# Altium PCB SolarPowerBank.PcbDoc
Units mm, origin at the board's own origin, x right, y up, seen from the top; angles counter-clockwise.
Board outline 50 x 50 mm, 2 copper layers (Top Layer, Bottom Layer); 81 components, 49 nets, 237 pads, 372 vias.
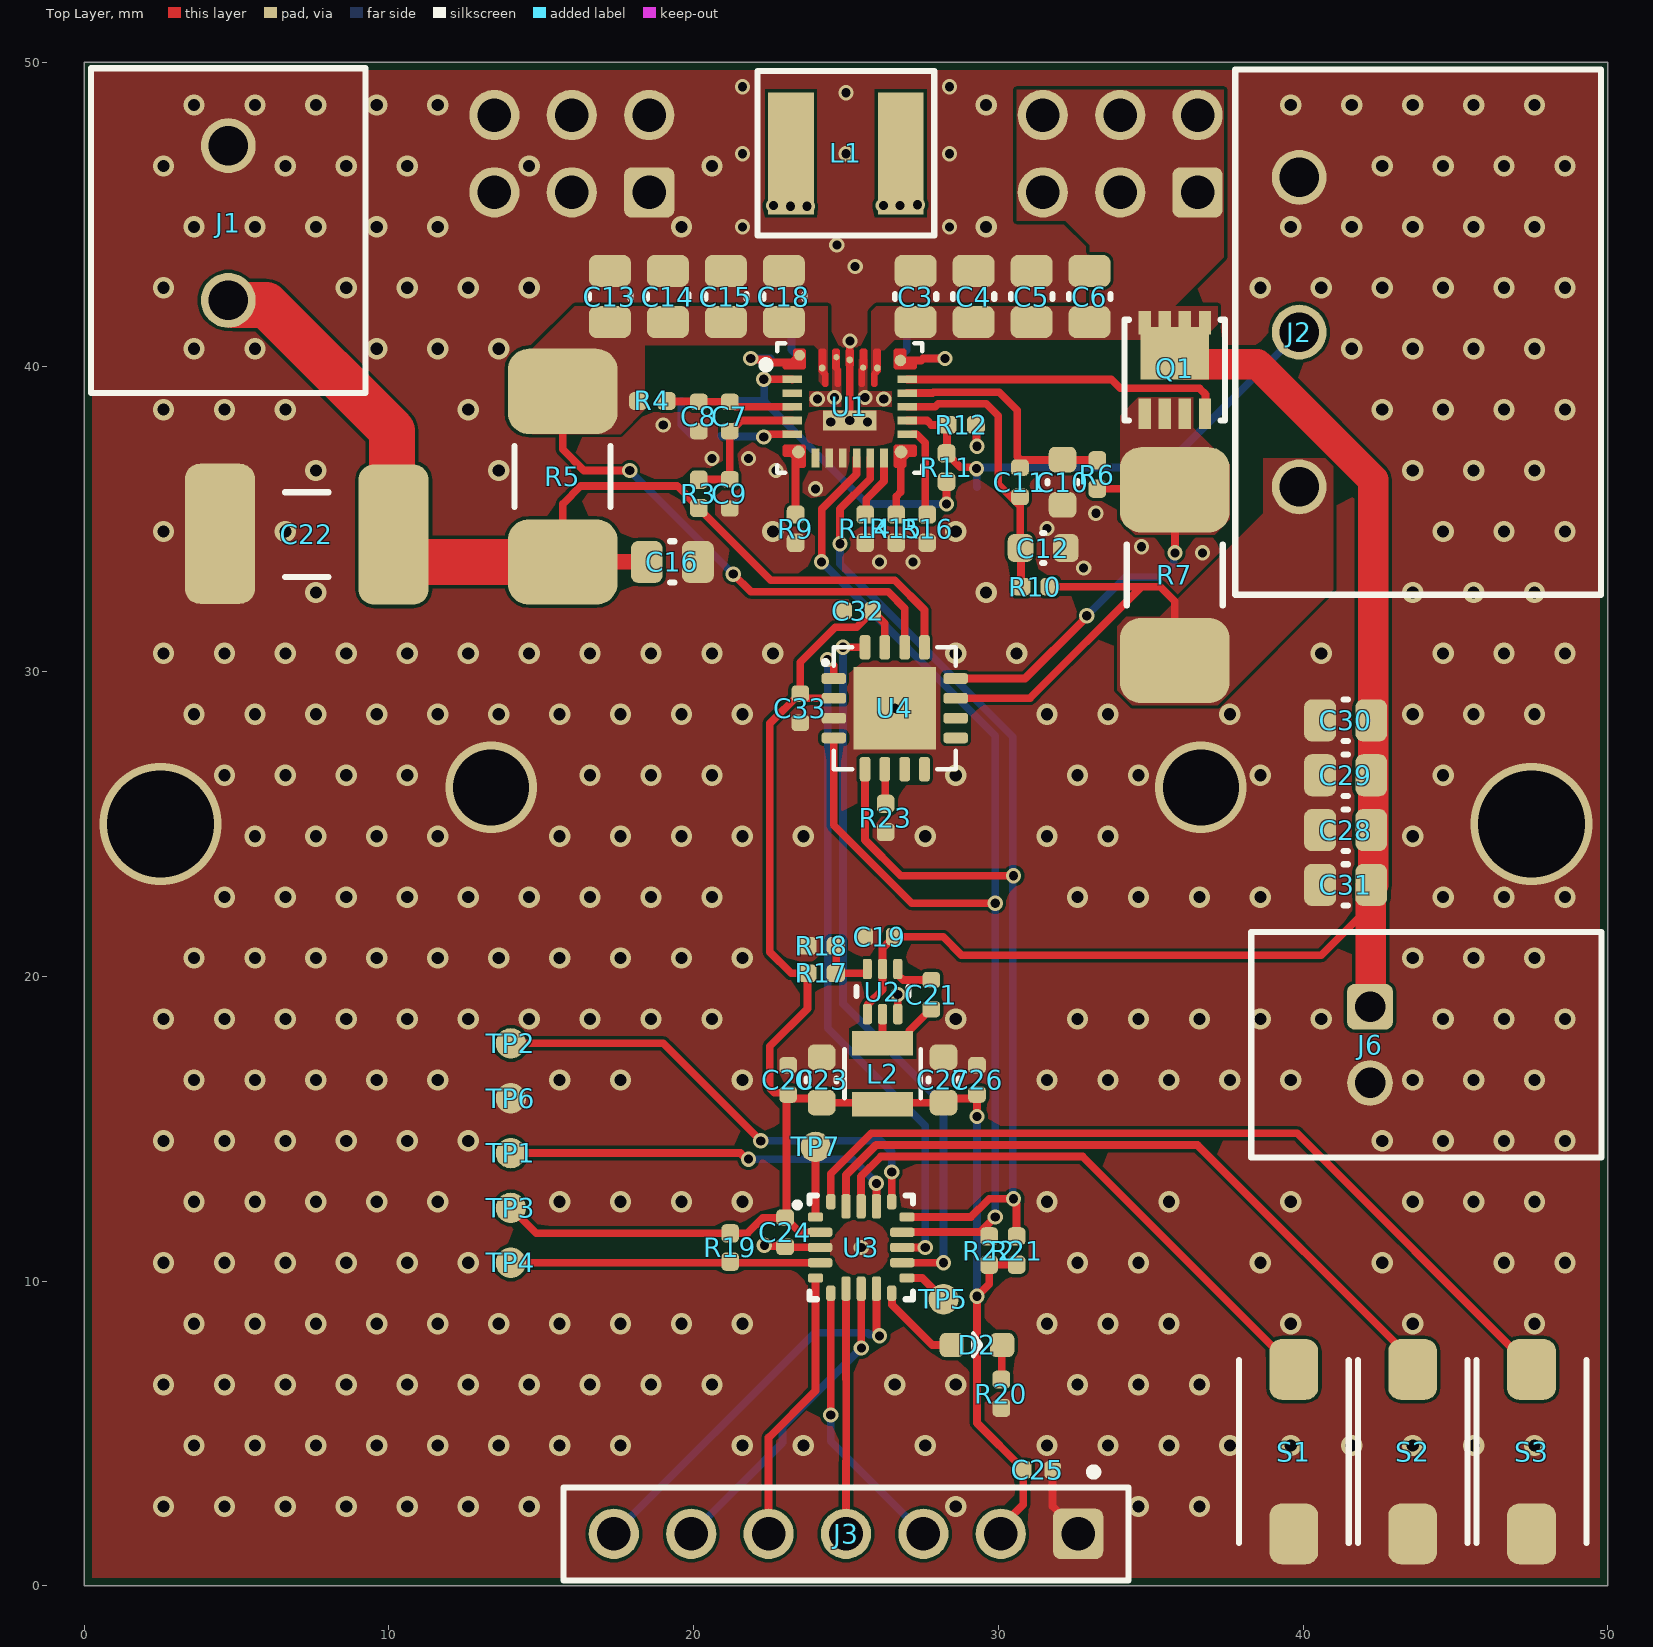
[diagram p0: Top Layer view]
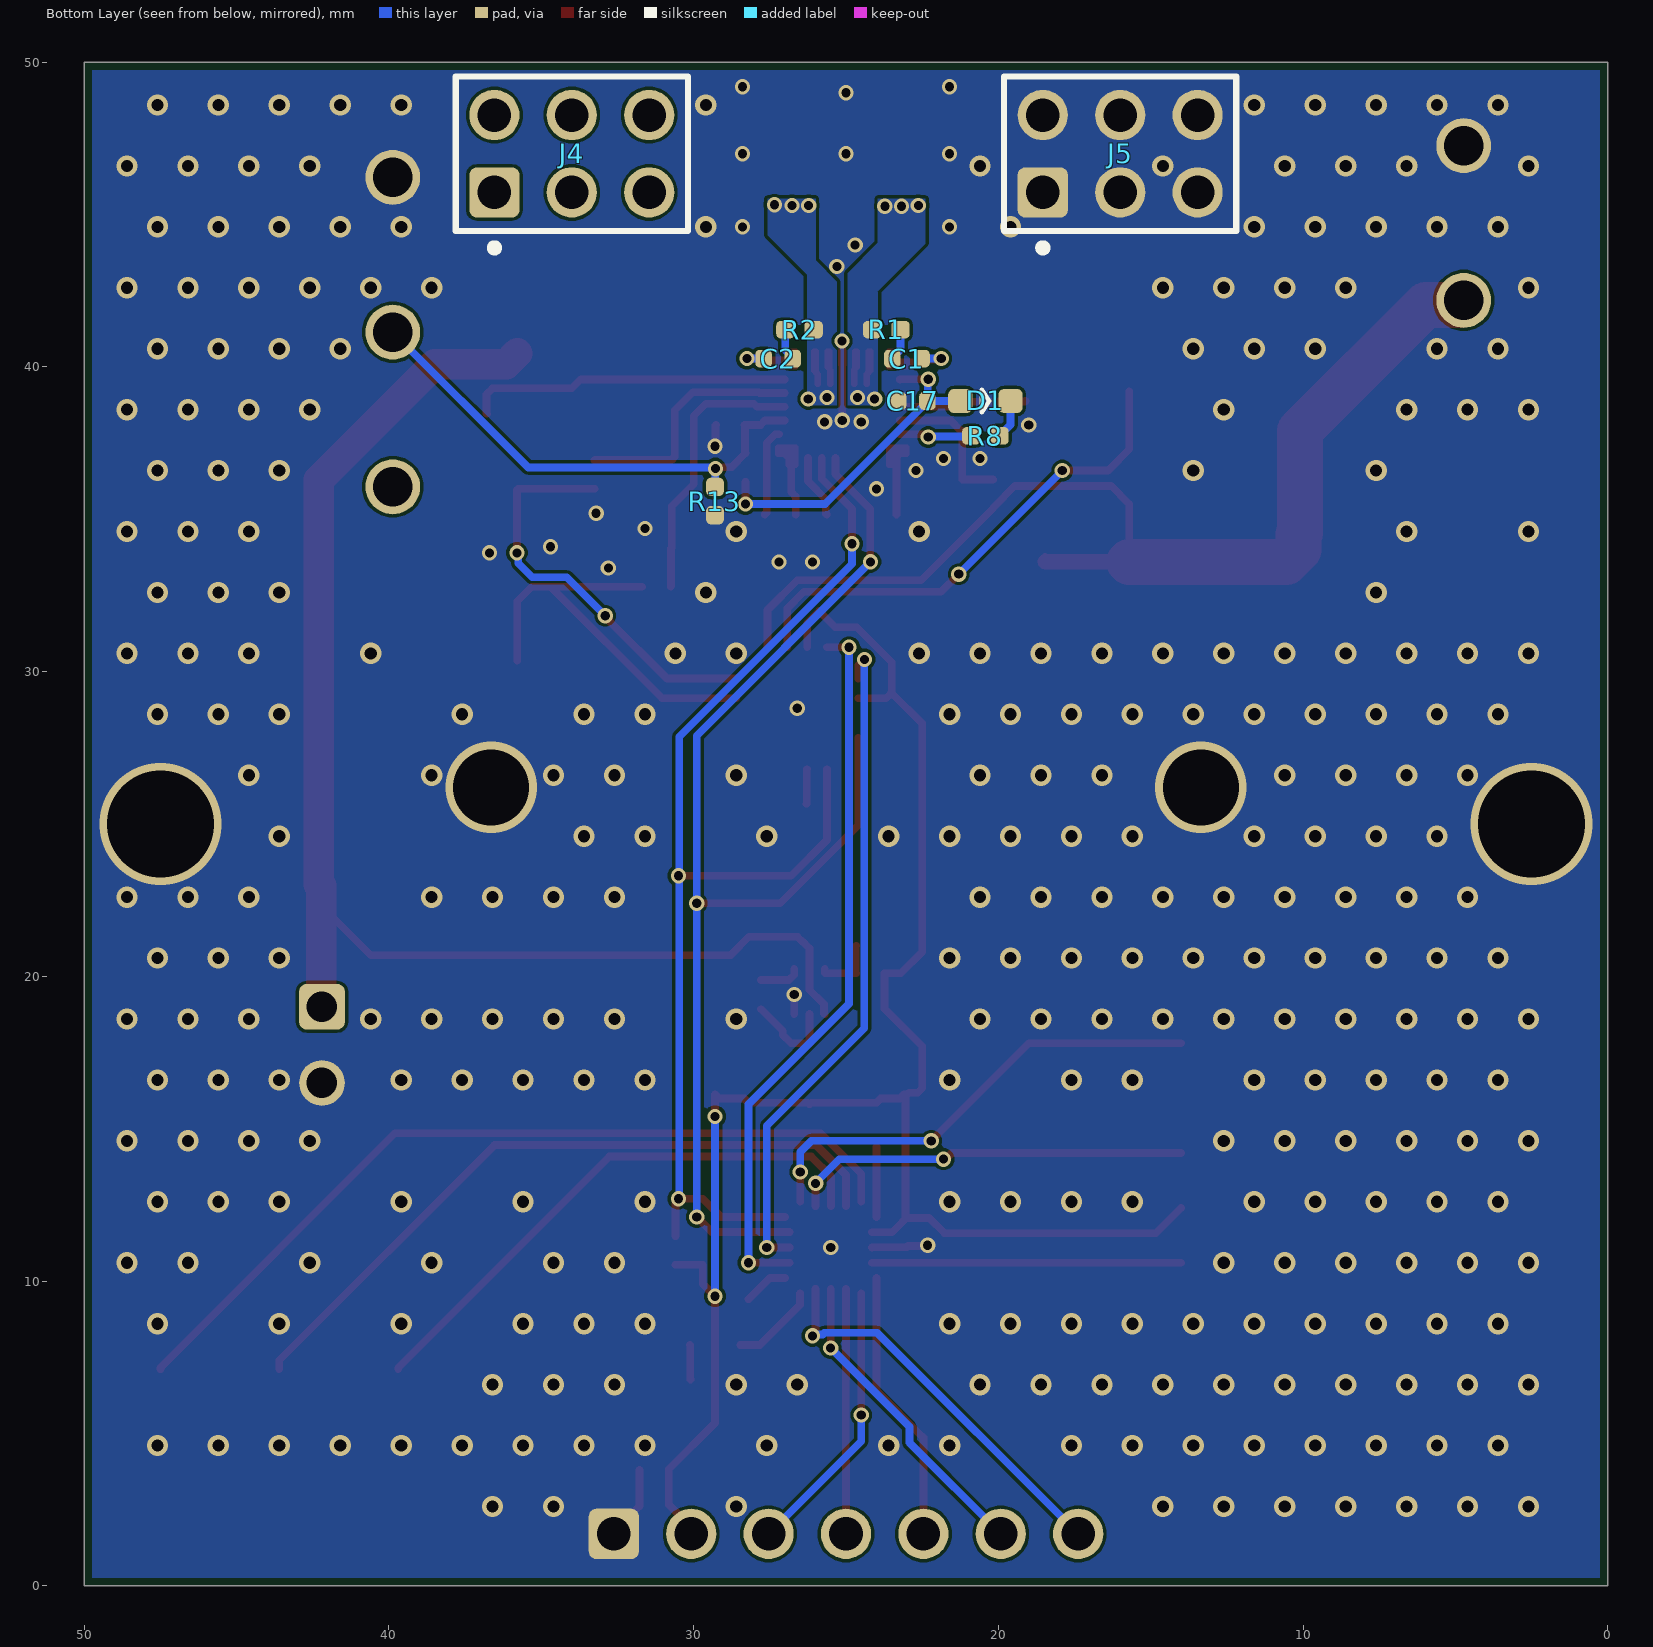
[diagram p1: Bottom Layer view, seen from below]
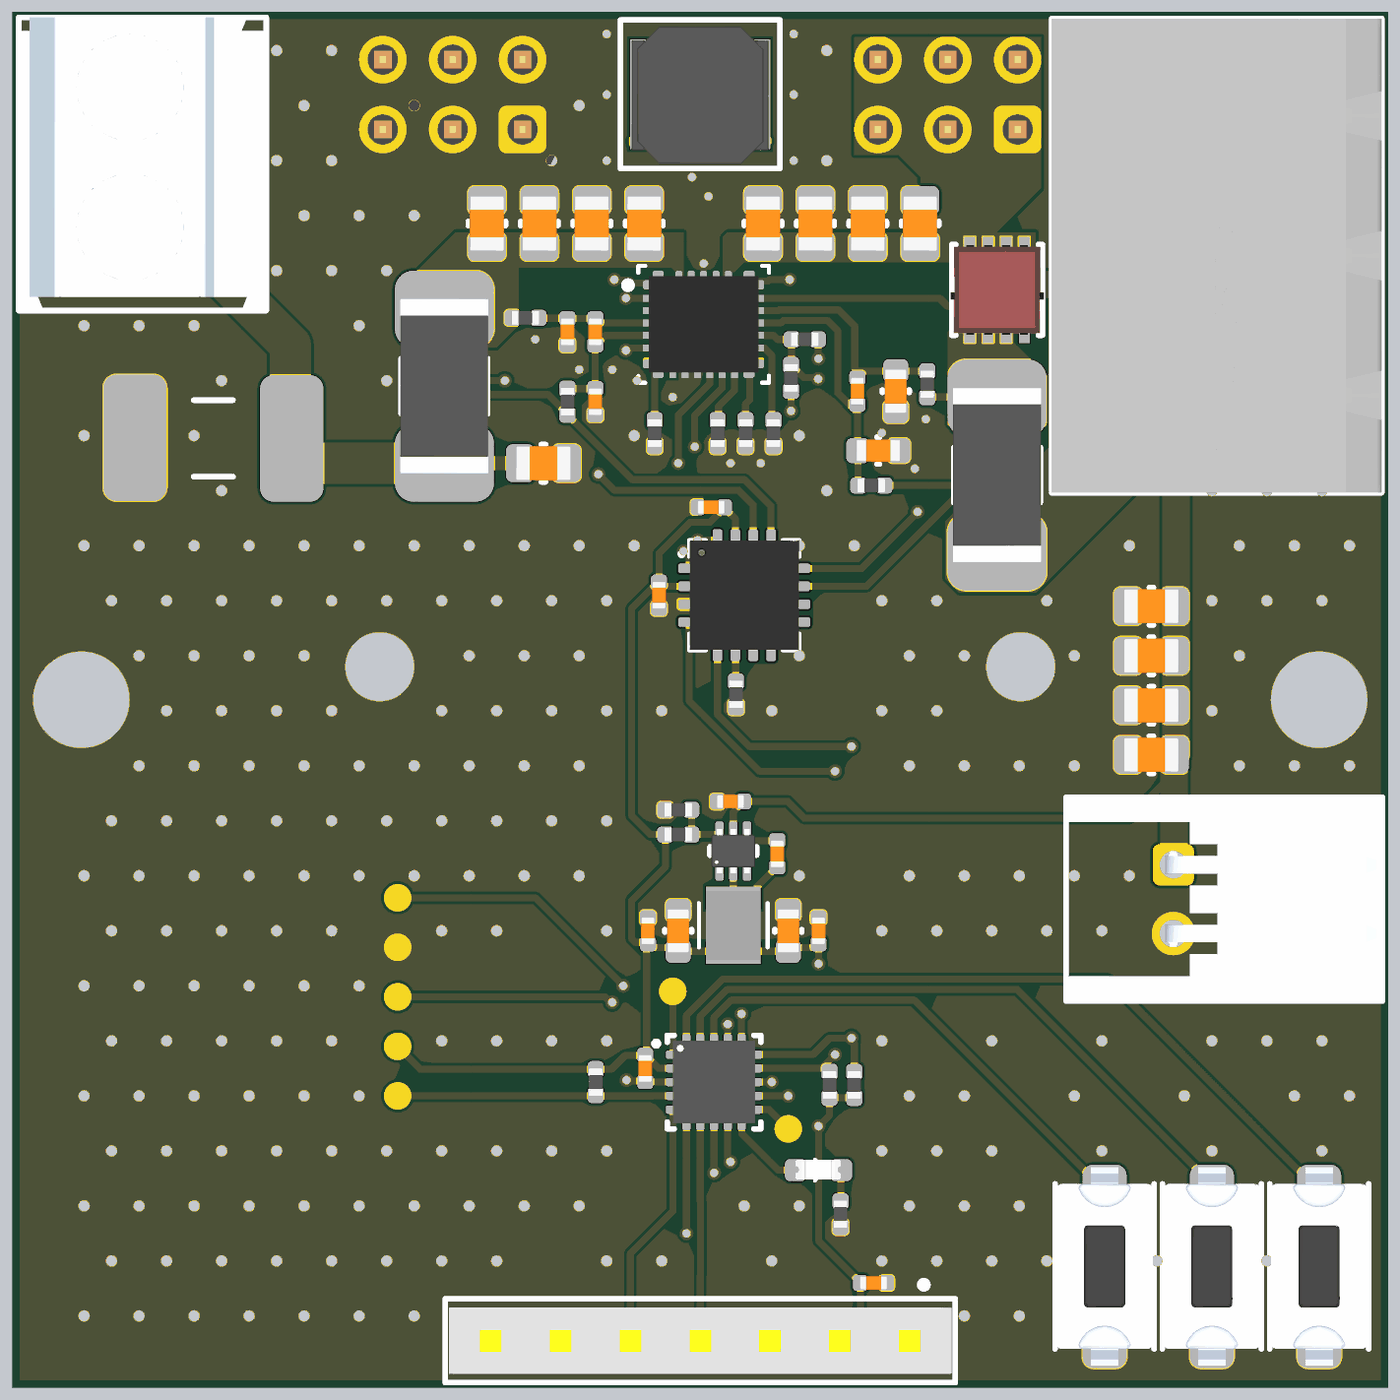
[diagram p2: 3D render of the assembled board from above, using the file's embedded part models]
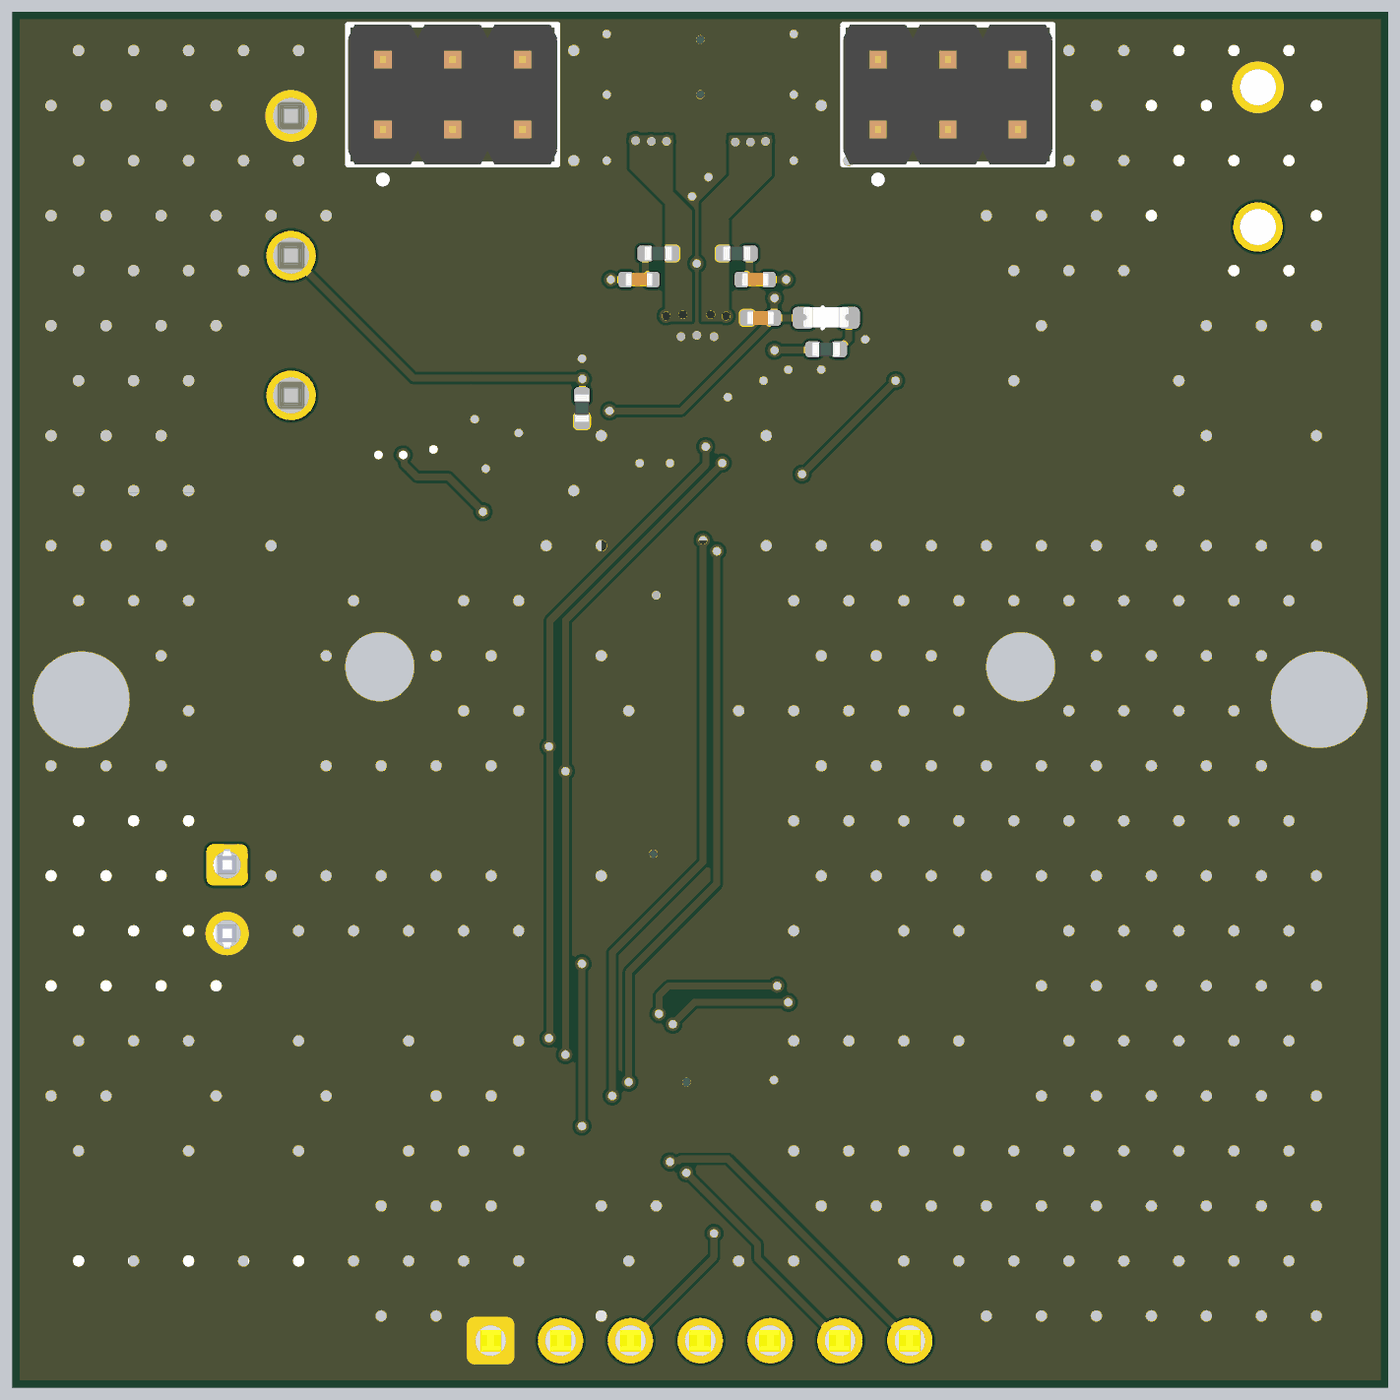
[diagram p3: 3D render of the assembled board from below, using the file's embedded part models]

## Layer stack, top to bottom
Top Solder: solder mask 0.0102, Solder Resist, Dk 3.5
Top Layer: signal copper 0.0356
Dielectric 1: dielectric 0.32, FR-4, Dk 4.8
Bottom Layer: signal copper 0.0356
Bottom Solder: solder mask 0.0102, Solder Resist, Dk 3.5

## Board outline
0,0 50,0 50,50 0,50

## Design rules (kind name [scope] priority, off if disabled: settings)
BoardOutlineClearance [All] p1: gap=0.254 ignorepadtopadclearanceinfootprint=FALSE except(0: Arc-OutlineEdge Arc-SplitContinuation Track-OutlineEdge Track-SplitContinuation SMDPad-SplitContinuation THPad-SplitContinuation Via-SplitContinuation Fill-SplitContinuation Poly-SplitContinuation Region-SplitContinuation Text-OutlineEdge Text-CavityEdge Text-CutoutEdge Text-SplitBarrior Text-SplitContinuation; 0.5: THPad-OutlineEdge Via-OutlineEdge)
Clearance [All] p1: gap=0.254 ignorepadtopadclearanceinfootprint=FALSE except(0: Arc-Hole Track-Hole SMDPad-Hole THPad-Hole Via-Hole Fill-Hole Poly-Hole Region-Hole Text-Hole; 0.1: Arc-Poly Track-Poly SMDPad-Poly THPad-Poly Via-Poly Fill-Poly Poly-Poly Poly-Region Region-Region; 0.127: Arc-Arc Arc-Track Arc-SMDPad Arc-Via Track-Track Track-SMDPad Track-Via SMDPad-SMDPad SMDPad-Via THPad-Via Via-Via; 0.15: Arc-Region Track-Region SMDPad-Region THPad-Region Via-Region Fill-Region; 0.2: Arc-THPad Track-THPad SMDPad-THPad; 0.5: THPad-THPad)
HoleSize [All] p1: absolutevalues=TRUE maxlimit=2.54 minlimit=0.15 maxpercent=80.000 minpercent=20.000
HoleToHoleClearance [All] p1: gap=0.2 allowstackedmicrovias=TRUE
MinimumAnnularRing [All] p1: minimumring=0.1
MinimumSolderMaskSliver [All] p1: minsoldermaskwidth=0.1
PlaneClearance [All] p1: clearance=0.254
PlaneConnect [All] p1: planeconnectstyle=Direct reliefexpansion=0.508 reliefentries=4 reliefconductorwidth=0.254 reliefairgap=0.254
PolygonConnect [All] p1: connectstyle=Direct reliefconductorwidth=0.254 reliefentries=4 polygonreliefangle="90 Angle" airgapwidth=0.254
RoutingVias [All] p1: holewidth=0.711 width=1.27 viastyle="Through Hole" minholewidth=0.711 minwidth=1.27 maxholewidth=0.711 maxwidth=1.27
SilkToSilkClearance [All] p1: silktosilkclearance=0.004
SilkToSolderMaskClearance [IsPad] p1: minsilkscreentomaskgap=0.004 clearancetoexposedcopper=TRUE
SolderMaskExpansion [All] p1: expansion=0.038 istentingtop=FALSE
Width [All] p1: maxlimit=2 minlimit=0.127 preferedwidth=0.254 minimp=50.000000 maximp=50.000000 favimp=50.000000
23 further rules are at their usual default settings.

## Components (designator, comment, footprint, x,y, rotation, side; value= is the part's Value field where it differs from the comment)
C1 "47n" C0402_N 23,40.275 r180 bottom
C2 "47n" C0402_N 27.225,40.275 r0 bottom
C3 "10n" C0805_N 27.282,42.313 r90 top
C4 "100n" C0805_N 29.187,42.313 r90 top
C5 "10u" C0805_N 31.092,42.313 r90 top
C6 "10u" C0805_N 32.997,42.313 r90 top
C7 "100n" C0402_N 21.186,38.376 r90 top
C8 "33n" C0402_N 20.17,38.376 r270 top
C9 "33n" C0402_N 21.186,35.836 r270 top
C10 "33n" C0603_N 32.108,36.217 r270 top
C11 "100n" C0402_N 30.711,36.217 r270 top
C12 "33n" C0603_N 31.473,34.058 r0 top
C13 "10n" C0805_N 17.249,42.313 r90 top
C14 "100n" C0805_N 19.154,42.313 r90 top
C15 "10u" C0805_N 21.059,42.313 r90 top
C16 "10u" C0805_N 19.3,33.6 r0 top
C17 "4,7u" C0402_N 22.809,38.884 r0 bottom
C18 "10u" C0805_N 22.964,42.313 r90 top
C19 "33n" C0402_N 26.1,21.3 r180 top
C20 "100n" C0402_N 23.1,16.6 r90 top
C21 "33n" C0402_N 27.8,19.4 r90 top
C22 "CAP_POL" C592D_D 7.3,34.5 r0 top
C23 "10u" C0603_N 24.2,16.6 r90 top
C24 "100n" C0402_N 23,11.6 r90 top
C25 "100n" C0402_N 31.3,3.8 r180 top
C26 "100n" C0402_N 29.3,16.6 r90 top
C27 "10u" C0603_N 28.2,16.6 r90 top
C28 "10n" C0805_N 41.4,24.8 r180 top
C29 "100n" C0805_N 41.4,26.6 r180 top
C30 "10u" C0805_N 41.4,28.4 r180 top
C31 "10u" C0805_N 41.4,23 r180 top
C32 "100n" C0402_N 25.4,32 r180 top
C33 "100n" C0402_N 23.5,28.8 r270 top
D1 "LED" LED_0603 20.424,38.884 r180 bottom
D2 "LED" LED_0603 29.3,7.9 r0 top
J1 "" TERM_BLOCK_2x1 4.725,44.725 r90 top
J2 "" TERM_BLOCK_CONNECTOR_3x1 39.875,41.145 r270 top
J3 "Display connector" PINSOCK_7X1_THT 25,1.7 r180 top
J4 "" PINHDR_3X2_THT_2,54 34,47 r180 bottom
J5 "" PINHDR_3X2_THT_2,54 16,47 r180 bottom
J6 "" S2B-XH-A-1 42.2,19 r270 top
L1 "IND" SNR5040 24.996,47.012 r0 top
L2 "IND" IND_2520 26.2,16.8 r90 top
Q1 "CSD19537" PowerPAK 35.791,39.9 r90 top
R1 "2,2" R0402_N 23.675,41.225 r0 bottom
R2 "2,2" R0402_N 26.525,41.225 r180 bottom
R3 "10" R0402_N 20.17,35.836 r270 top
R4 "10" R0402_N 18.646,38.884 r180 top
R5 "10m" R2512_Wide 15.7,36.4 r90 top
R6 "10" R0402_N 33.251,36.471 r90 top
R7 "10m" R2512_Wide 35.791,33.169 r270 top
R8 "2k" R0402_N 20.424,37.741 r0 bottom
R9 "1k5" R0402_N 23.345,34.693 r90 top
R10 "10" R0402_N 31.219,32.788 r180 top
R11 "5.6k" R0402_N 28.3,36.7 r270 top
R12 "47k" R0402_N 28.8,38.1 r180 top
R13 "DNR" R0402_N 29.3,35.6 r90 bottom
R14 "3k9" R0402_N 25.631,34.693 r270 top
R15 "15k" R0402_N 26.647,34.693 r270 top
R16 "10k" R0402_N 27.663,34.693 r270 top
R17 "12k" R0402_N 24.2,20.1 r180 top
R18 "2k7" R0402_N 24.2,21 r0 top
R19 "2k" R0402_N 21.2,11.1 r90 top
R20 "2k" R0402_N 30.1,6.3 r270 top
R21 "2k" R0402_N 30.6,11 r270 top
R22 "2k" R0402_N 29.7,11 r270 top
R23 "2k" R0402_N 26.3,25.2 r90 top
S1 "PUSHBUTTON" DTSM-3 39.7,4.4 r0 top
S2 "PUSHBUTTON" DTSM-3 43.6,4.4 r0 top
S3 "PUSHBUTTON" DTSM-3 47.5,4.4 r0 top
TP1 "TP" TP_1MM 14,14.2 r90 top
TP2 "TP" TP_1MM 14,17.8 r90 top
TP3 "TP" TP_1MM 14,12.4 r90 top
TP4 "TP" TP_1MM 14,10.6 r90 top
TP5 "TP" TP_1MM 28.2,9.4 r90 top
TP6 "TP" TP_1MM 14,16 r90 top
TP7 "TP" TP_1MM 24,14.4 r90 top
U1 "BQ25690" WQFN-HR-26 25.123,38.649 r0 top
U2 "TPS561243" SOT-563 26.2,19.5 r90 top
U3 "STM32C011F4" UFQFPN20 25.5,11.1 r0 top
U4 "PAC1931" UQFN-16 26.6,28.8 r0 top

## Footprints (in the part's own frame and the unit in brackets; to place one, negate y for a bottom-side part, rotate by r counter-clockwise, add the part's x,y. Pads: shape width x height; smd on the part's side, far side on the other; paste and mask are expansions set on the pad)
C0402_N [mm] "Capacitor, Chip; 1.00 mm L X 0.50 mm W X 0.55 mm H body"
  rrect52% 0.54x0.58 smd: 1(-0.48,0) 2(0.48,0)
  body extent -0.5,-0.25 0.5,0.25, height 0.55
C592D_D [mm] "Tantalum Capacitor"
  rrect43% 2.3x4.6 smd: N(-2.85,0.025) P(2.85,0)
  silkscreen extent -0.71,-1.39 0.71,1.39
C0603_N [mm] "Capacitor, Chip; 1.60 mm L X 0.80 mm W X 0.87 mm H body"
  rrect50% 0.84x0.91 smd: 1(-0.745,0) 2(0.745,0)
  silkscreen extent -0.05,-0.49 0.05,0.49, body extent -0.8,-0.4 0.8,0.4, height 0.87
C0805_N [mm] "Capacitor, Chip; 2.00 mm L X 1.25 mm W X 1.35 mm H body"
  rrect48% 1.05x1.38 smd: 1(-0.84,0) 2(0.84,0)
  silkscreen extent -0.08,-0.68 0.08,0.68, body extent -1,-0.63 1,0.63, height 1.35
DTSM-3 [mm] "SMD push button"
  rrect50% 1.6x2 smd: 1(0,2.7) 2(0,-2.7)
  silkscreen extent -1.8,-3 1.8,3, body extent -1.75,-3.6 1.75,3.6, height 4.3
IND_2520 [mm] "2.5 mm x 2.0 mm"
  rect 0.8x2 smd: 1(-1,0) 2(1,0)
  silkscreen extent -0.8,-1.25 0.8,1.25, body extent -1.25,-1 1.25,1, height 1
LED_0603 [mm] "LED, 0603"
  rrect50% 0.8x0.8 smd: A(-0.825,0) K(0.825,0)
  silkscreen extent -0.13,-0.38 0.13,0.38, body extent -0.83,-0.34 0.82,0.38, height 0.68
PINHDR_3X2_THT_2,54 [mm] "THT Vertical Pin Header, Pitch 2.54mm, Dual Row,  6 pins"
  rrect30% 1.65x1.65 / inner round 1.65 / far side rrect30% 1.65x1.65 hole 1.1 paste-1.65: 1(-2.54,-1.27)
  round 1.65 hole 1.1 paste-1.65: 2(-2.54,1.27) 3(0,-1.27) 4(0,1.27) 5(2.54,-1.27) 6(2.54,1.27)
  silkscreen extent -3.81,-3.21 3.81,2.54, body extent -3.81,-2.54 3.81,2.54, height 8.55
PINSOCK_7X1_THT [mm] "THT Vertical Pin Header, Pitch 2.54mm, Dual Row, 7 pins"
  rrect30% 1.65x1.65 / inner round 1.65 / far side rrect30% 1.65x1.65 hole 1.1 paste-1.65: 1(-7.62,0)
  round 1.65 hole 1.1 paste-1.65: 2(-5.08,0) 3(-2.54,0) 4(0,0) 5(2.54,0) 6(5.08,0) 7(7.62,0)
  silkscreen extent -9.27,-2.16 9.27,1.52, body extent -9.14,-1.21 9.14,1.21, height 8.51
PowerPAK [mm] "1212-8"
  rect 1.725x2.235 smd: D(0.557,0)
  rect 0.76x0.405 smd: D(1.55,-0.99) D(1.55,-0.33) D(1.55,0.33) D(1.55,0.99)
  rect 0.99x0.405 smd: G(-1.435,-0.99) S(-1.435,-0.33) S(-1.435,0.33) S(-1.435,0.99)
  silkscreen extent -1.65,-1.65 1.65,1.65, body extent -1.63,-1.7 1.64,1.7, height 1.12
R0402_N [mm] "Resistor, Chip; 1.00 mm L X 0.50 mm W X 0.40 mm H body"
  rrect52% 0.6x0.58 smd: 1(-0.465,0) 2(0.465,0)
  body extent -0.5,-0.25 0.5,0.25, height 0.4
R2512_Wide [mm] "Resistor, Chip; 6.3mm L X 3.15 mm W X 0.6 mm H body"
  rrect49% 2.8x3.6 smd: 1(-2.8,0) 2(2.8,0)
  silkscreen extent -1,-1.58 1,1.58, body extent -3.17,-1.6 3.18,1.6, height 0.65
S2B-XH-A-1 [mm] "Header, Horizontal, 2.50 mm pitch;"
  rrect33% 1.5x1.5 / inner round 1.5 / far side rrect33% 1.5x1.5 hole 1 paste-1.5: 1(0,0)
  round 1.5 hole 1 paste-1.5: 2(2.5,0)
  silkscreen extent -2.45,-3.9 4.95,7.6, body extent -2.45,-3.9 4.95,7.6, height 6.1
SNR5040 [mm] "2-Leads, Body 5.00x5.00mm"
  rect 1.5x4 smd: 1(-1.8,0) 2(1.8,0)
  silkscreen extent -2.9,-2.7 2.9,2.7, body extent -2.5,-2.54 2.5,2.46, height 4
SOT-563 [mm]
  rrect48% 0.67x0.3 smd: 1(-0.74,0.5) 2(-0.74,0) 3(-0.74,-0.5) 4(0.74,-0.5) 5(0.74,0) 6(0.74,0.5)
  silkscreen extent -0.15,-0.85 0.15,0.85, body extent -0.8,-0.8 0.8,0.8, height 0.6
TERM_BLOCK_2x1 [mm] "TERMINAL BLOCK, TE CONNECTIVITY 282841-2"
  round 1.8 hole 1.3: 1(2.54,0) 2(-2.54,0)
  silkscreen extent -5.58,-4.5 5.08,4.5, body extent -5.58,-4.5 5.08,4.5, height 15.2
TERM_BLOCK_CONNECTOR_3x1 [mm] "KFG-2EDGRC-5.08-3P"
  round 1.8 hole 1.3: 1(-5.08,0) 2(0,0) 3(5.08,0)
  silkscreen extent -8.62,-2.1 8.62,9.9, body extent -8.62,-2.1 8.62,9.9, height 8.8
TP_1MM [mm]
  round 1 smd paste-100 mask+0: 1(0,0)
UFQFPN20 [mm] "UFQFPN20 package"
  rrect49% 0.5x0.3 smd: 1(-1.5,1) 5(-1.5,-1) 11(1.5,-1) 15(1.5,1)
  rrect49% 0.8x0.3 smd: 2(-1.35,0.5) 3(-1.35,0) 4(-1.35,-0.5) 12(1.35,-0.5) 13(1.35,0) 14(1.35,0.5)
  rrect49% 0.3x0.5 smd: 6(-1,-1.5) 10(1,-1.5) 16(1,1.5) 20(-1,1.5)
  rrect49% 0.3x0.8 smd: 7(-0.5,-1.35) 8(0,-1.35) 9(0.5,-1.35) 17(0.5,1.35) 18(0,1.35) 19(-0.5,1.35)
  silkscreen extent -2.16,-1.7 1.7,1.7, body extent -1.5,-1.5 1.5,1.5, height 0.6
UQFN-16 [mm] "UQFN, 16 pin, 4 mm L X 4 mm W X 0.5 mm H body"
  rrect50% 0.8x0.35 smd mask+0.07: 1(-2,0.975) 2(-2,0.325) 3(-2,-0.325) 4(-2,-0.975) 9(2,-0.975) 10(2,-0.325) 11(2,0.325) 12(2,0.975)
  rrect50% 0.35x0.8 smd mask+0.07: 5(-0.975,-2) 6(-0.325,-2) 7(0.325,-2) 8(0.975,-2) 13(0.975,2) 14(0.325,2) 15(-0.325,2) 16(-0.975,2)
  rect 2.7x2.7 smd mask+0.07: TH(0,0)
  silkscreen extent -2.35,-2 2,2, body extent -2,-2 2,2, height 0.92
WQFN-HR-26 [mm]
  round 0.356 smd paste+0 mask+0: 1(-1.647,1.736)
  rect 0.625x0.25 smd paste+0 mask+0: 2(-1.887,0.944) 3(-1.887,0.494) 4(-1.887,0.044) 5(-1.887,-0.406) 6(-1.887,-0.856) 15(1.887,-0.856) 16(1.887,-0.406) 17(1.887,0.044) 18(1.887,0.494) 19(1.887,0.944)
  round 0.422 smd paste-0.198 mask+0: 7(-1.684,-1.435) 14(1.684,-1.435)
  rect 0.25x0.625 smd paste+0 mask+0: 8(-1.125,-1.639) 9(-0.675,-1.639) 10(-0.225,-1.639) 11(0.225,-1.639) 12(0.675,-1.639) 13(1.125,-1.639)
  round 0.382 smd paste+0 mask+0: 20(1.662,1.566)
  round 0.225 smd paste+0 mask+0: 21(0.903,1.318) 23(0,1.584) 25(-0.903,1.318)
  round 0.203 smd paste+0 mask+0: 22(0.437,1.329) 24(-0.437,1.672)
  rect 1.77x0.652 smd paste-0.872 mask+0: 26(0,-0.4)
  Top Layer region: -1.025,1.187 -1.025,1.899 -0.975,1.949 -0.825,1.949 -0.775,1.899 -0.775,1.22 -0.7,1.145 -0.7,0.759 -0.75,0.709 -0.85,0.709 -0.9,0.759 -0.9,1.062
  Top Layer region: 1.025,1.187 1.025,1.899 0.975,1.949 0.825,1.949 0.775,1.899 0.775,1.22 0.7,1.145 0.7,0.759 0.75,0.709 0.85,0.709 0.9,0.759 0.9,1.062
  Top Layer region: 0.325,1.316 0.325,1.899 0.375,1.949 0.525,1.949 0.575,1.899 0.575,1.302 0.5,1.227 0.5,0.759 0.45,0.709 0.35,0.709 0.3,0.759 0.3,1.291
  Top Layer region: -0.325,1.316 -0.325,1.899 -0.375,1.949 -0.525,1.949 -0.575,1.899 -0.575,1.302 -0.5,1.227 -0.5,0.759 -0.45,0.709 -0.35,0.709 -0.3,0.759 -0.3,1.291
  Top Layer region: -0.125,1.389 -0.125,1.899 -0.075,1.949 0.075,1.949 0.125,1.899 0.125,1.389 0.1,1.364 0.1,0.759 0.05,0.709 -0.05,0.709 -0.1,0.759 -0.1,1.364
  Top Layer region: -1.5,1.269 -2.15,1.269 -2.2,1.319 -2.2,1.549 -2.15,1.599 -1.95,1.599 -1.85,1.699 -1.85,1.899 -1.8,1.949 -1.5,1.949 -1.45,1.899 -1.45,1.319
  Top Layer region: 1.5,1.269 2.15,1.269 2.2,1.319 2.2,1.549 2.15,1.599 1.95,1.599 1.85,1.699 1.85,1.899 1.8,1.949 1.5,1.949 1.45,1.899 1.45,1.319
  Top Layer region: -1.95,-1.601 -2.15,-1.601 -2.2,-1.551 -2.2,-1.251 -2.15,-1.201 -1.5,-1.201 -1.45,-1.251 -1.45,-1.901 -1.5,-1.951 -1.8,-1.951 -1.85,-1.901 -1.85,-1.701
  Top Layer region: 1.95,-1.601 2.15,-1.601 2.2,-1.551 2.2,-1.251 2.15,-1.201 1.5,-1.201 1.45,-1.251 1.45,-1.901 1.5,-1.951 1.8,-1.951 1.85,-1.901 1.85,-1.701
  silkscreen extent -2.87,-2.13 2.37,2.12, body extent -2,-1.75 2,1.75, height 0.8

## Part data
C1 C2 C3 C4 C5 C6 C7 C8 C9 C10 C11 C12 C13 C14 C15 C16 C17 C18 C19 C20 C21 C23 C24 C25 C26 C27 C28 C29 C30 C31 C32 C33: library part CAP, RevS="$Rev:: 58        $"
J1: library part SOCHDR_2X1, "Socket", ComponentLink1Description=Manufacturer, ComponentLink1URL=http://www.we-online.de, ComponentLink2Description=Datasheet, ComponentLink2URL=http://katalog.we-online.de/em/datasheet/691412320002.pdf
J2: library part SOCHDR_3X1, "Socket", ComponentLink1Description=Manufacturer, ComponentLink1URL=http://www.we-online.de, ComponentLink2Description=Datasheet, ComponentLink2URL=http://katalog.we-online.de/em/datasheet/691412320002.pdf
J3: library part SOCHDR_7X1, "Socket", ComponentLink1Description=Manufacturer, ComponentLink1URL=http://www.we-online.de, ComponentLink2Description=Datasheet, ComponentLink2URL=http://katalog.we-online.de/em/datasheet/691412320002.pdf
J4 J5: library part PINHDR_3x2
J6: library part PINHDR_2X1, "Socket", ComponentLink1Description=Manufacturer, ComponentLink1URL=http://www.we-online.de, ComponentLink2Description=Datasheet, ComponentLink2URL=http://katalog.we-online.de/em/datasheet/691412320002.pdf
L1 L2: "Inductor"
Q1: library part MOSFET_N
R1 R2 R3 R4 R5 R6 R7 R8 R9 R10 R11 R12 R13 R14 R15 R16 R17 R18 R19 R20 R21 R22 R23: library part RES
U1: "Standalone/I2C Controlled, 34V, 1- to 7-Cell Li-Ion, 3A Buck-Boost Bidirectional NVDC Battery Charger with Bypass Mode and USB-PD OTG Output"
U3: library part MCU_STM32C011F4
C22: RevS="$Rev:: 58        $"

## Via types
v1: diameter 0.7, hole 0.4, Top Layer to Bottom Layer, tented both sides, 298 vias
v2: diameter 0.5, hole 0.3, Top Layer to Bottom Layer, tented both sides, 70 vias
v3: diameter 3, hole 2.5, Top Layer to Bottom Layer, 2 vias
v4: diameter 4, hole 3.5, Top Layer to Bottom Layer, 2 vias

## Nets (pads, with @x,y where several pads share a name; then routed paths per layer and width w, separated by ;. In a path a pad name is that pad's centre, name@x,y a point inside that pad or via, vN(x,y) a via of type N, cw(c..) or ccw(c..) an arc to the next point about the centre after c; other vN are vias at no path point)
3V3: C20.1 C23.1 C24.2 C25.2 C26.1 C27.1 C32.1 C33.1 J3.2 L2.1 R17.2 R19.2 R21.2 R22.2 TP3.1 U3.2 U4.2 U4.15 | length 60.8
  Top Layer w0.254: TP3.1 14.835,11.565 21.765,11.565 22.268,12.068 22.988,12.068 C24.2 ; C20.1@23.032,16.083 22.938,16.177 22.649,16.177 22.5,16.326 22.5,17.702 23.735,18.937 R17.2 23.2,20.1 22.5,20.8 22.5,28.3 23.48,29.28 C33.1 ; C20.1@23.05,15.987 23.05,12.13 C24.2 ; C20.1 23.15,16.07 23.15,15.987 23.867,15.987 24,15.855 C23.1 26.145,15.855 L2.1 26.255,15.855 C27.1 28.333,15.988 29.168,15.988 C26.1 v2(29.3,15.4) ; U3.2 23.48,11.6 23.155,11.925 23.155,11.938 23.013,12.08 C24.2 ; U4.2 23.682,29.125 23.527,29.28 C33.1 ; C32.1 C32.1@25.88,31.98 ; U4.15 26.275,31.581 25.88,31.976 C32.1@25.88,31.98 ; J3.2 30.08,1.926 30.82,2.666 C25.2 30.82,3.82 29.3,5.34 v2(29.3,9.5) 29.7,9.9 R22.2 R21.2 ; C33.1 23.5,30.312 24.644,31.456 25.356,31.456 C32.1@25.88,31.98
  Bottom Layer w0.254: v2(29.3,9.5) v2(29.3,15.4)
BTN1: S1.1 U3.18 | length 18.4
  Top Layer w0.254: U3.18 25.492,12.458 25.492,13.433 26.143,14.084 32.768,14.084 38.928,7.924 39.7,7.152 S1.1
BTN2: S2.1 U3.19 | length 23.3
  Top Layer w0.254: U3.19 25,13.479 25.986,14.465 36.535,14.465 43.6,7.4 S2.1
BTN3: S3.1 U3.20 | length 27.7
  Top Layer w0.254: U3.20 24.5,13.518 25.828,14.846 39.806,14.846 47.5,7.152 S3.1
DISP_DC: J3.6 U3.8 | length 10.4
  Top Layer w0.254: U3.8 25.502,9.748 25.502,7.802 v2(25.504,7.8)
  Bottom Layer w0.254: J3.6 22.916,4.696 22.916,5.212 v2(25.504,7.8)
DISP_RESET: J3.5 U3.5 | length 9
  Top Layer w0.254: J3.5 22.46,4.86 24,6.4 U3.5
DISP_SPI_CS: J3.7 U3.9 | length 13.1
  Top Layer w0.254: U3.9 26,8.367 26.1,8.267 v2(26.1,8.2)
  Bottom Layer w0.254: J3.7 23.984,8.304 25.709,8.304 25.766,8.247 26.053,8.247 v2(26.1,8.2)
DISP_SPI_MOSI: J3.4 U3.7 | length 8.1
  Top Layer w0.254: J3.4 25,4.075 25.004,4.079 25.004,6.776 25,6.78 U3.7
DISP_SPI_SCK: J3.3 U3.6 | length 9.2
  Top Layer w0.254: v2(24.5,5.6) U3.6
  Bottom Layer w0.254: v2(24.5,5.6) 24.5,4.74 J3.3
GND: C3.2 C4.2 C5.2 C6.2 C8.2 C9.2 C10.2 C12.2 C13.2 C14.2 C15.2 C16.2 C17.2 C18.2 C19.2 C20.2 C22.N C23.2 C24.1 C25.1 C26.2 C27.2 C28.2 C29.2 C30.2 C31.2 C32.2 C33.2 J1.1 J2.1 J3.1 J5.1 J5.2 J5.3 J5.4 J5.5 J5.6 J6.2 R9.1 R12.1 R13.1 R14.2 R15.2 R16.2 R18.1 R20.2 R23.1 S1.2 S2.2 S3.2 TP6.1 U1.9 U1.10 U1.23 U1.26 U2.3 U3.3 U4.3 U4.TH | length 8.6
  Top Layer w0.254: v2(22.32,11.175) 22.347,11.147 22.973,11.147 C24.1 23.01,11.11 24.14,11.11 U3.3 ; v2@25.1,40.8 25.123,40.777 U1.23 v2(25.123,38.249) ; U2.3 v2(26.7,19.4) ; R12.1 29.282,38.082 29.282,37.417 v2(29.3,37.4) ; C25.1 31.78,2.605 32.62,1.765 J3.1 ; v4@47.6,24.6 47.75,24.75 v4@47.75,24.9
  other v1: 2.6,2.6 4.6,2.6 6.6,2.6 8.6,2.6 10.6,2.6 12.6,2.6 14.6,2.6 28.6,2.6 34.6,2.6 36.6,2.6 3.6,4.6 5.6,4.6 7.6,4.6 9.6,4.6 11.6,4.6 13.6,4.6 15.6,4.6 17.6,4.6 21.6,4.6 23.6,4.6 27.6,4.6 31.6,4.6 33.6,4.6 35.6,4.6 37.6,4.6 39.6,4.6 41.6,4.6 43.6,4.6 45.6,4.6 47.6,4.6 2.6,6.6 4.6,6.6 6.6,6.6 8.6,6.6 10.6,6.6 12.6,6.6 14.6,6.6 16.6,6.6 18.6,6.6 20.6,6.6 26.6,6.6 28.6,6.6 32.6,6.6 34.6,6.6 36.6,6.6 3.6,8.6 5.6,8.6 7.6,8.6 9.6,8.6 11.6,8.6 13.6,8.6 15.6,8.6 17.6,8.6 19.6,8.6 21.6,8.6 31.6,8.6 33.6,8.6 35.6,8.6 39.6,8.6 43.6,8.6 47.6,8.6 2.6,10.6 4.6,10.6 6.6,10.6 8.6,10.6 10.6,10.6 12.6,10.6 32.6,10.6 34.6,10.6 38.6,10.6 42.6,10.6 46.6,10.6 48.6,10.6 3.6,12.6 5.6,12.6 7.6,12.6 9.6,12.6 11.6,12.6 15.6,12.6 17.6,12.6 19.6,12.6 21.6,12.6 31.6,12.6 35.6,12.6 39.6,12.6 43.6,12.6 45.6,12.6 47.6,12.6 2.6,14.6 4.6,14.6 6.6,14.6 8.6,14.6 10.6,14.6 12.6,14.6 42.6,14.6 44.6,14.6 46.6,14.6 48.6,14.6 3.6,16.6 5.6,16.6 7.6,16.6 9.6,16.6 11.6,16.6 15.6,16.6 17.6,16.6 21.6,16.6 31.6,16.6 33.6,16.6 35.6,16.6 37.6,16.6 39.6,16.6 43.6,16.6 45.6,16.6 47.6,16.6 2.6,18.6 4.6,18.6 6.6,18.6 8.6,18.6 10.6,18.6 12.6,18.6 14.6,18.6 16.6,18.6 18.6,18.6 20.6,18.6 28.6,18.6 32.6,18.6 34.6,18.6 36.6,18.6 38.6,18.6 40.6,18.6 44.6,18.6 46.6,18.6 48.6,18.6 3.6,20.6 5.6,20.6 7.6,20.6 9.6,20.6 11.6,20.6 13.6,20.6 15.6,20.6 17.6,20.6 19.6,20.6 21.6,20.6 43.6,20.6 45.6,20.6 47.6,20.6 4.6,22.6 6.6,22.6 8.6,22.6 10.6,22.6 12.6,22.6 14.6,22.6 16.6,22.6 18.6,22.6 20.6,22.6 32.6,22.6 34.6,22.6 36.6,22.6 38.6,22.6 44.6,22.6 46.6,22.6 48.6,22.6 5.6,24.6 7.6,24.6 9.6,24.6 11.6,24.6 15.6,24.6 17.6,24.6 19.6,24.6 21.6,24.6 23.6,24.6 27.6,24.6 31.6,24.6 33.6,24.6 43.6,24.6 4.6,26.6 6.6,26.6 8.6,26.6 10.6,26.6 16.6,26.6 18.6,26.6 20.6,26.6 28.6,26.6 32.6,26.6 34.6,26.6 38.6,26.6 44.6,26.6 3.6,28.6 5.6,28.6 7.6,28.6 9.6,28.6 11.6,28.6 13.6,28.6 15.6,28.6 17.6,28.6 19.6,28.6 21.6,28.6 31.6,28.6 33.6,28.6 37.6,28.6 43.6,28.6 45.6,28.6 47.6,28.6 2.6,30.6 4.6,30.6 6.6,30.6 8.6,30.6 10.6,30.6 12.6,30.6 14.6,30.6 16.6,30.6 18.6,30.6 20.6,30.6 22.6,30.6 28.6,30.6 30.6,30.6 40.6,30.6 44.6,30.6 46.6,30.6 48.6,30.6 7.6,32.6 29.6,32.6 43.6,32.6 45.6,32.6 47.6,32.6 2.6,34.6 6.6,34.6 22.6,34.6 28.6,34.6 44.6,34.6 46.6,34.6 48.6,34.6 7.6,36.6 13.6,36.6 43.6,36.6 45.6,36.6 47.6,36.6 2.6,38.6 4.6,38.6 6.6,38.6 12.6,38.6 42.6,38.6 44.6,38.6 46.6,38.6 48.6,38.6 3.6,40.6 5.6,40.6 9.6,40.6 11.6,40.6 13.6,40.6 41.6,40.6 43.6,40.6 45.6,40.6 47.6,40.6 2.6,42.6 8.6,42.6 10.6,42.6 12.6,42.6 14.6,42.6 38.6,42.6 40.6,42.6 42.6,42.6 44.6,42.6 46.6,42.6 48.6,42.6 3.6,44.6 5.6,44.6 7.6,44.6 9.6,44.6 11.6,44.6 19.6,44.6 29.6,44.6 39.6,44.6 41.6,44.6 43.6,44.6 45.6,44.6 47.6,44.6 2.6,46.6 6.6,46.6 8.6,46.6 10.6,46.6 14.6,46.6 20.6,46.6 42.6,46.6 44.6,46.6 46.6,46.6 48.6,46.6 3.6,48.6 5.6,48.6 7.6,48.6 9.6,48.6 11.6,48.6 29.6,48.6 39.6,48.6 41.6,48.6 43.6,48.6 45.6,48.6 47.6,48.6
  other v2: 25.5,11.1 26.6,28.8 32.8,33.4 26.1,33.6 27.2,33.6 36.7,33.9 34.7,34.1 31.6,34.7 33.2,35.2 24,36 22.7,36.6 20.6,37 21.8,37 19,38.1 24.5,38.2 25.7,38.2 25.129,40.857 25.3,43.3 24.7,44 21.6,44.6 28.4,44.6 21.6,47 25,47 28.4,47 25,49 21.6,49.2 28.4,49.2
  other v3: 13.35,26.2 36.65,26.2
  other v4: 2.5,25 47.5,25
I2C_SCL: R22.1 U1.11 U3.14 U4.4 | length 40.2
  Top Layer w0.254: v2(24.2,33.604) 24.2,35.339 25.346,36.485 25.346,37.009 U1.11 ; U4.4 24.6,24.961 27.161,22.4 v2(29.9,22.4) ; U3.14 26.858,11.608 29.408,11.608 v2(29.9,12.1)
  Bottom Layer w0.254: v2(24.2,33.604) 24.2,33.6 29.9,27.9 v2(29.9,12.1)
I2C_SDA: R21.1 U1.12 U3.15 U4.5 | length 39.8
  Top Layer w0.254: v2(24.8,34.2) 24.8,35.339 25.798,36.337 U1.12 ; U4.5 25.625,24.475 26.8,23.3 v2(30.5,23.3) ; U3.15 29.1,12.1 29.7,12.7 v2(30.5,12.7) 30.5,12.633 30.6,12.533 R21.1
  Bottom Layer w0.254: v2(24.8,34.2) 24.8,33.539 30.473,27.866 30.473,12.727 v2(30.5,12.7)
NetC1_1: C1.1 R1.1 | length 1.1
  Bottom Layer w0.254: R1.1 23.21,40.572 23.48,40.302 C1.1
NetC1_2: C1.2 U1.1 | length 2.2
  Top Layer w0.254: v2(21.875,40.275) 21.903,40.247 22.445,40.247 22.542,40.15 23.4,40.15
  Bottom Layer w0.254: v2(21.875,40.275) C1.2
NetC2_1: C2.1 R2.1 | length 1.1
  Bottom Layer w0.254: C2.1 26.745,40.302 26.99,40.547 R2.1
NetC2_2: C2.2 U1.20 | length 2
  Top Layer w0.254: U1.20 27.472,40.215 27.531,40.275 v2(28.25,40.275)
  Bottom Layer w0.254: C2.2 v2(28.25,40.275)
NetC7_1: C7.1 C9.1 R3.1 U1.5 | length 4.8
  Top Layer w0.254: R3.1 20.178,36.308 21.179,36.308 C9.1 C7.1 21.213,37.896 21.56,38.243 U1.5
NetC7_2: C7.2 C8.1 R4.1 U1.4 | length 4.2
  Top Layer w0.254: R4.1 19.125,38.87 20.156,38.87 C8.1 C7.2 21.213,38.856 21.376,38.693 U1.4
NetC10_1: C10.1 C11.1 R6.2 U1.18 | length 8.1
  Top Layer w0.254: U1.18 27.835,39.143 27.866,39.174 30.026,39.174 30.618,38.582 30.618,37.055 30.711,36.962 30.724,36.949 33.238,36.949 R6.2
NetC11_2: C11.2 C12.1 R10.2 U1.17 | length 9.1
  Top Layer w0.254: U1.17 27.924,38.693 28.024,38.793 29.607,38.793 30,38.4 30,36.148 30.72,35.429 30.72,34.067 C12.1 30.741,34.045 30.741,32.801 R10.2
NetC21_1: C21.1 L2.2 U2.2 | length 3.1
  Top Layer w0.254: U2.2 L2.2 26.8,17.8 27.073,18.073 27.073,18.213 27.78,18.92 C21.1
NetC21_2: C21.2 U2.4 | length 1.4
  Top Layer w0.254: U2.4 26.7,20.055 26.875,19.88 C21.2
NetD1_K: D1.K R8.1 | length 1.3
  Bottom Layer w0.254: D1.K 19.599,38.103 R8.1 R8.1
NetD2_A: D2.A U3.10 | length 2.9
  Top Layer w0.254: U3.10 26.511,9.589 26.511,9.223 27.834,7.9 D2.A
NetD2_K: D2.K R20.1 | length 1.1
  Top Layer w0.254: R20.1 30.113,6.777 30.113,7.888 D2.K
NetJ2_2: J2.2 R11.1 R12.2 R13.2 U1.16 | length 16.5
  Top Layer w0.254: U1.16 27.657,38.243 27.8,38.1 R12.2 28.317,38.082 28.317,37.182 R11.1 28.303,37.165 28.757,36.711 29.239,36.711 v2(29.286,36.664)
  Bottom Layer w0.254: v2(29.286,36.664) 29.286,36.557 29.293,36.55 29.293,36.072 R13.2 ; v2@29.378,36.7 35.43,36.7 J2.2
NetL1_1: L1.1 R1.2 U1.24
  other v2: 24.059,38.953 24.619,39 23.175,45.275 23.725,45.275 22.625,45.3
NetL1_2: L1.2 R2.2 U1.22
  other v2: 26.239,38.953 25.627,39 26.225,45.3 26.775,45.3 27.35,45.325
NetQ1_G: Q1.G U1.19 | length 10.6
  Top Layer w0.254: U1.19 33.707,39.593 34,39.3 36.6,39.3 36.8,39.1 36.8,38.484 Q1.G
NetR8_2: R8.2 U1.6 | length 2.4
  Top Layer w0.254: v2(22.3,37.7) 22.393,37.793 U1.6
  Bottom Layer w0.254: R8.2 20.91,37.72 22.28,37.72 v2(22.3,37.7)
NetR9_2: R9.2 U1.7 | length 2.1
  Top Layer w0.254: R9.2 23.345,37.075 23.439,37.168 U1.7
NetR14_1: R14.1 U1.13 | length 2.1
  Top Layer w0.254: R14.1 25.661,35.188 25.661,35.661 26.246,36.246 26.246,37.009 U1.13
NetR15_1: R15.1 U1.14 | length 2.1
  Top Layer w0.254: R15.1 26.647,35.747 26.8,35.9 26.8,37.206 U1.14
NetR16_1: R16.1 U1.15 | length 2.9
  Top Layer w0.254: U1.15@27.196,37.791 27.322,37.791 27.6,37.513 27.6,35.221 R16.1
NetR17_1: R17.1 R18.2 U2.6 | length 2.1
  Top Layer w0.254: R17.1 R17.1@24.683,20.1 ; R18.2 24.683,20.982 R17.1@24.683,20.1 ; U2.6 25.7,20.123 25.677,20.1 R17.1@24.683,20.1
NetR19_1: R19.1 TP4.1 U3.4 | length 10.2
  Top Layer w0.254: TP4.1 21.165,10.6 21.169,10.596 23.313,10.596 23.317,10.6 U3.4
NetR23_2: R23.2 U4.6 | length 1.1
  Top Layer w0.254: U4.6 26.287,26.788 26.287,25.678 R23.2
NetTP5_1: TP5.1 U3.11 | length 1.5
  Top Layer w0.254: U3.11 27.5,10.1 TP5.1
NetTP7_1: TP7.1 U3.1 | length 2.3
  Top Layer w0.254: U3.1 TP7.1
PWRDN: U3.12 U4.16 | length 23.6
  Top Layer w0.254: v2(24.9,30.8) U4.16 ; U3.12 v2(28.2,10.6)
  Bottom Layer w0.254: v2(24.9,30.8) 24.9,19.1 28.2,15.8 v2(28.2,10.6)
REGN: C17.1 D1.A R11.2 U1.2 | length 10.9
  Top Layer w0.254: v2(22.3,39.6) 22.305,39.595 23.234,39.595 U1.2 ; v2(28.3,35.5) R11.2
  Bottom Layer w0.254: D1.A C17.1 ; v2(22.3,39.6) 22.315,39.585 22.315,38.898 C17.1 ; v2(28.3,35.5) 25.693,35.5 22.329,38.864 C17.1
SLOW: U3.13 U4.1 | length 22.1
  Top Layer w0.254: v2(24.396,30.4) 24.4,30.4 24.6,30.2 U4.1 ; U3.13 26.852,11.102 27.598,11.102 v2(27.6,11.104)
  Bottom Layer w0.254: v2(24.396,30.4) 24.4,30.396 24.4,18.3 27.6,15.1 v2(27.6,11.104)
SWCLK: TP1.1 U3.17 | length 13.2
  Top Layer w0.254: TP1.1 21.533,14.2 21.733,14 v2(21.8,14) ; v2(25.996,13.206) 25.998,13.204 U3.17 U3.17
  Bottom Layer w0.254: v2(21.8,14) 25.22,14 25.996,13.223 v2(25.996,13.206)
SWDIO: TP2.1 U3.16 | length 15.6
  Top Layer w0.254: TP2.1 19,17.8 v2(22.2,14.6) ; U3.16 v2(26.501,13.58)
  Bottom Layer w0.254: v2(22.2,14.6) 26.133,14.6 26.501,14.232 v2(26.501,13.58)
VBat: J2.3 R7.2 R10.1 U4.11 | length 13.9
  Top Layer w0.254: U4.11 31.037,29.125 34.7,32.788 ; R10.1 34.7,32.788 ; R7.2 35.791,32.309 35.312,32.788 34.7,32.788
VBatS1: Q1.S R6.1 R7.1 U4.12 | length 13.7
  Top Layer w0.254: U4.12 30.875,29.775 32.777,31.677 32.777,31.71 v2(32.9,31.833) ; R6.1 35.754,36.006 R7.1 35.8,35.96 v2(35.8,33.9)
  Bottom Layer w0.254: v2(32.9,31.833) 34.167,33.1 35.3,33.1 35.758,33.558 35.758,33.858 v2(35.8,33.9)
VIn: C13.1 C14.1 C15.1 C18.1 R4.2 R5.2 U1.25 U4.14 | length 16.6
  Top Layer w0.254: R5.2 15.7,37.3 16.4,36.6 v2(17.9,36.6) ; v2(21.3,33.2) 21.881,32.619 26.381,32.619 26.925,32.075 U4.14
  Bottom Layer w0.254: v2(17.9,36.6) v2(21.3,33.2)
VPwr: C16.1 C22.P J1.2 R3.2 R5.1 U4.13 | length 36.7
  Top Layer w0.254: R5.1 15.7,35.5 16.296,36.096 19.455,36.096 20.17,35.381 R3.2 20.17,35.361 22.531,33 26.6,33 27.575,32.025 U4.13 ; C16.1 C16.1@18.46,33.765
  Top Layer w0.508: R5.1 C16.1
  Top Layer w1.5: J1.2 4.875,42.035 5.965,42.035 10.1,37.9 10.1,34.55 C22.P 10.15,34 10.55,33.6 R5.1
Vsys: C3.1 C4.1 C5.1 C6.1 C19.1 C28.1 C29.1 C30.1 C31.1 J4.1 J4.2 J4.3 J4.4 J4.5 J4.6 J6.1 Q1.D U1.21 U2.1 U2.5 | length 45
  Top Layer w0.254: U2.1 25.723,18.783 25.723,19.085 26.2,19.562 U2.5 26.2,20.92 26.425,21.145 26.438,21.145 26.58,21.287 C19.1 28.186,21.3 28.79,20.696 40.596,20.696 C31.1@42.22,22.32
  Top Layer w1: Q1.D@35.791,40.457 36.154,40.095 38.505,40.095 42.3,36.3 C31.1@42.3,23 ; J6.1 42.22,19.02 42.22,22.32 42.22,22.98 C31.1
pads on no net: U1.3 U1.8 U4.7 U4.8 U4.9 U4.10

## Polygon pours and split planes (outlines as drawn)
GND on Top Layer "GND_L01_P009" (solid, remove dead copper, pour order 9): 0,0 50,0 50,50 0,50
VBat on Top Layer "VBAT_L01_P008" (solid, pour order 8): 41,36.997 41,32.695 37.202,28.897 34.402,28.897 33.902,29.397 33.902,31.497 34.205,31.8 35.305,31.8 38.703,35.198 38.703,36.997
NetL1_1 on Top Layer "NETL1_1_L01_P000" (solid, pour order 0): 23.8,38.692 24.85,38.692 24.85,39.947 24.55,40.247 24.55,39.2 23.8,39.2
NetL1_2 on Top Layer "NETL1_2_L01_P001" (solid, pour order 1): 25.4,38.692 26.5,38.692 26.5,39.2 25.7,39.2 25.7,40.247 25.691,40.256 25.423,40.256 25.423,39.173 25.4,39.15
VIn on Top Layer "VIN_L01_P004" (solid, pour order 4): 24.423,39.408 24.4,39.431 24.4,42 16.1,42 14.7,40.6 14.7,37.8 17.6,37.8 18.4,38.6 18.4,40.702 23.935,40.711 24.098,40.548 24.098,39.533 24.223,39.408
Vsys on Top Layer "VSYS_L01_P005" (solid, pour order 5): 26.148,39.836 26.148,40.548 26.248,40.548 26.6,40.9 36.7,40.9 37.2,41.4 37.2,42 26,42 25.823,41.823 25.823,39.408 25.873,39.358 25.973,39.358 26.023,39.408 26.023,39.711
VBatS1 on Top Layer "VBATS1_L01_P007" (solid, pour order 7): 34.6,39 36.4,39 36.4,38 37.6,36.8 37.6,35 37.1,34.5 34.5,34.5 34,35 34,38.4
Vsys on Top Layer "VSYS_L01_P006" (solid, pour order 6): 30.6,49.1 30.6,44.8 32.2,44.8 33,44 33,41.7 35.5,41.7 37.4,43.6 37.4,49.1
GND on Bottom Layer "GND_L02_P010" (solid, pour order 10): 0,0 50,0 50,50 0,50
NetL1_1 on Bottom Layer "NETL1_1_L02_P002" (solid, pour order 2): 23.95,38.75 24.95,38.75 24.95,43.075 23.95,44.075 23.95,45.525 22.4,45.525 22.4,44.05 23.975,42.475 23.95,42.45
NetL1_2 on Bottom Layer "NETL1_2_L02_P003" (solid, pour order 3): 25.3,38.75 26.275,38.75 26.275,43.025 27.575,44.325 27.575,45.525 26,45.525 26,43.5 25.3,42.8

## Silkscreen, mask and mechanical layers (free items; w line width, h text height)
Mechanical 1:
  the board outline again, w0.254